# Altium PCB PCB1.PcbDoc
Units mil, origin at the board's own origin, x right, y up, seen from the top; angles counter-clockwise.
Board outline 4770 x 3855 mil, 2 copper layers (Top Layer, Bottom Layer); 31 components, 13 nets, 67 pads, 0 vias.
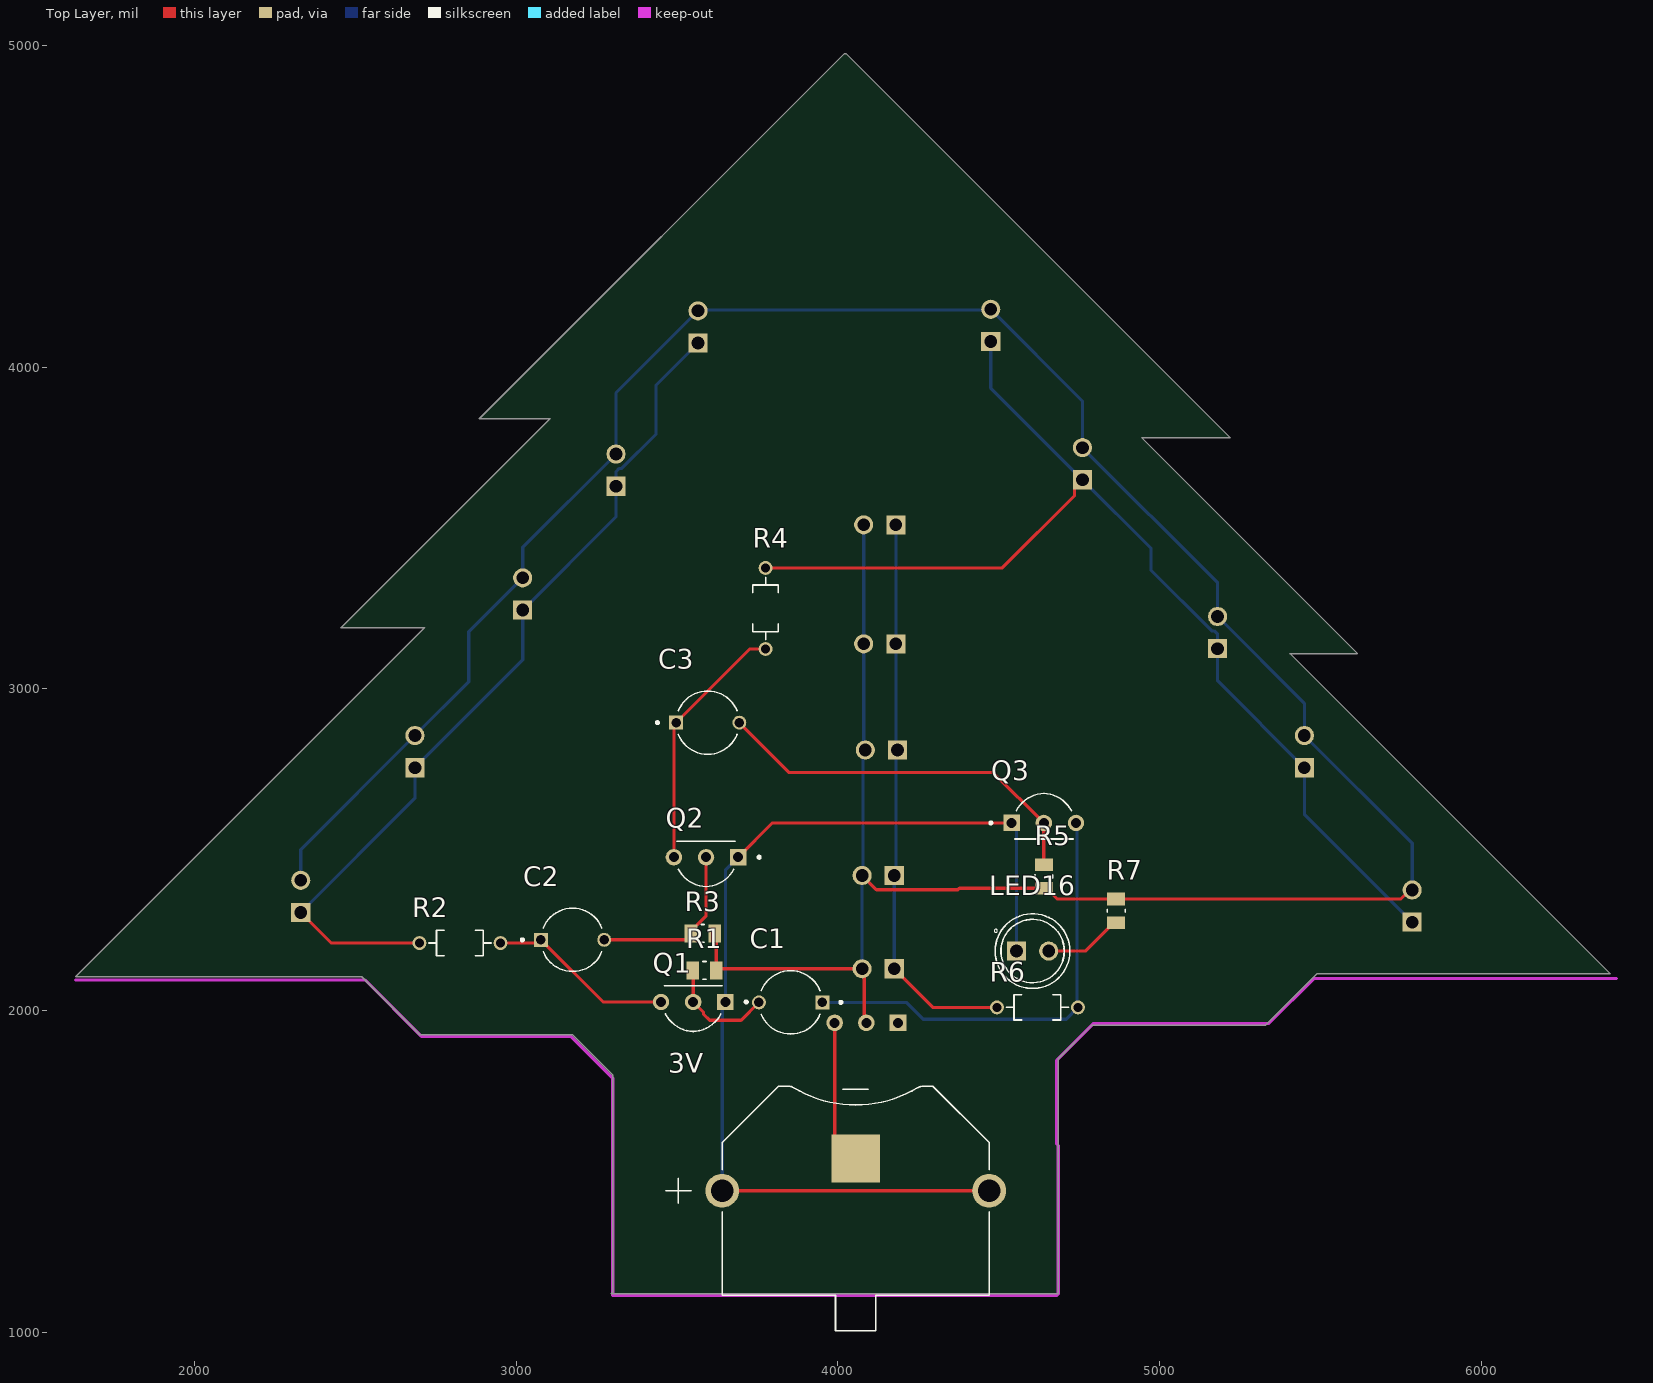
[diagram p0: Top Layer view]
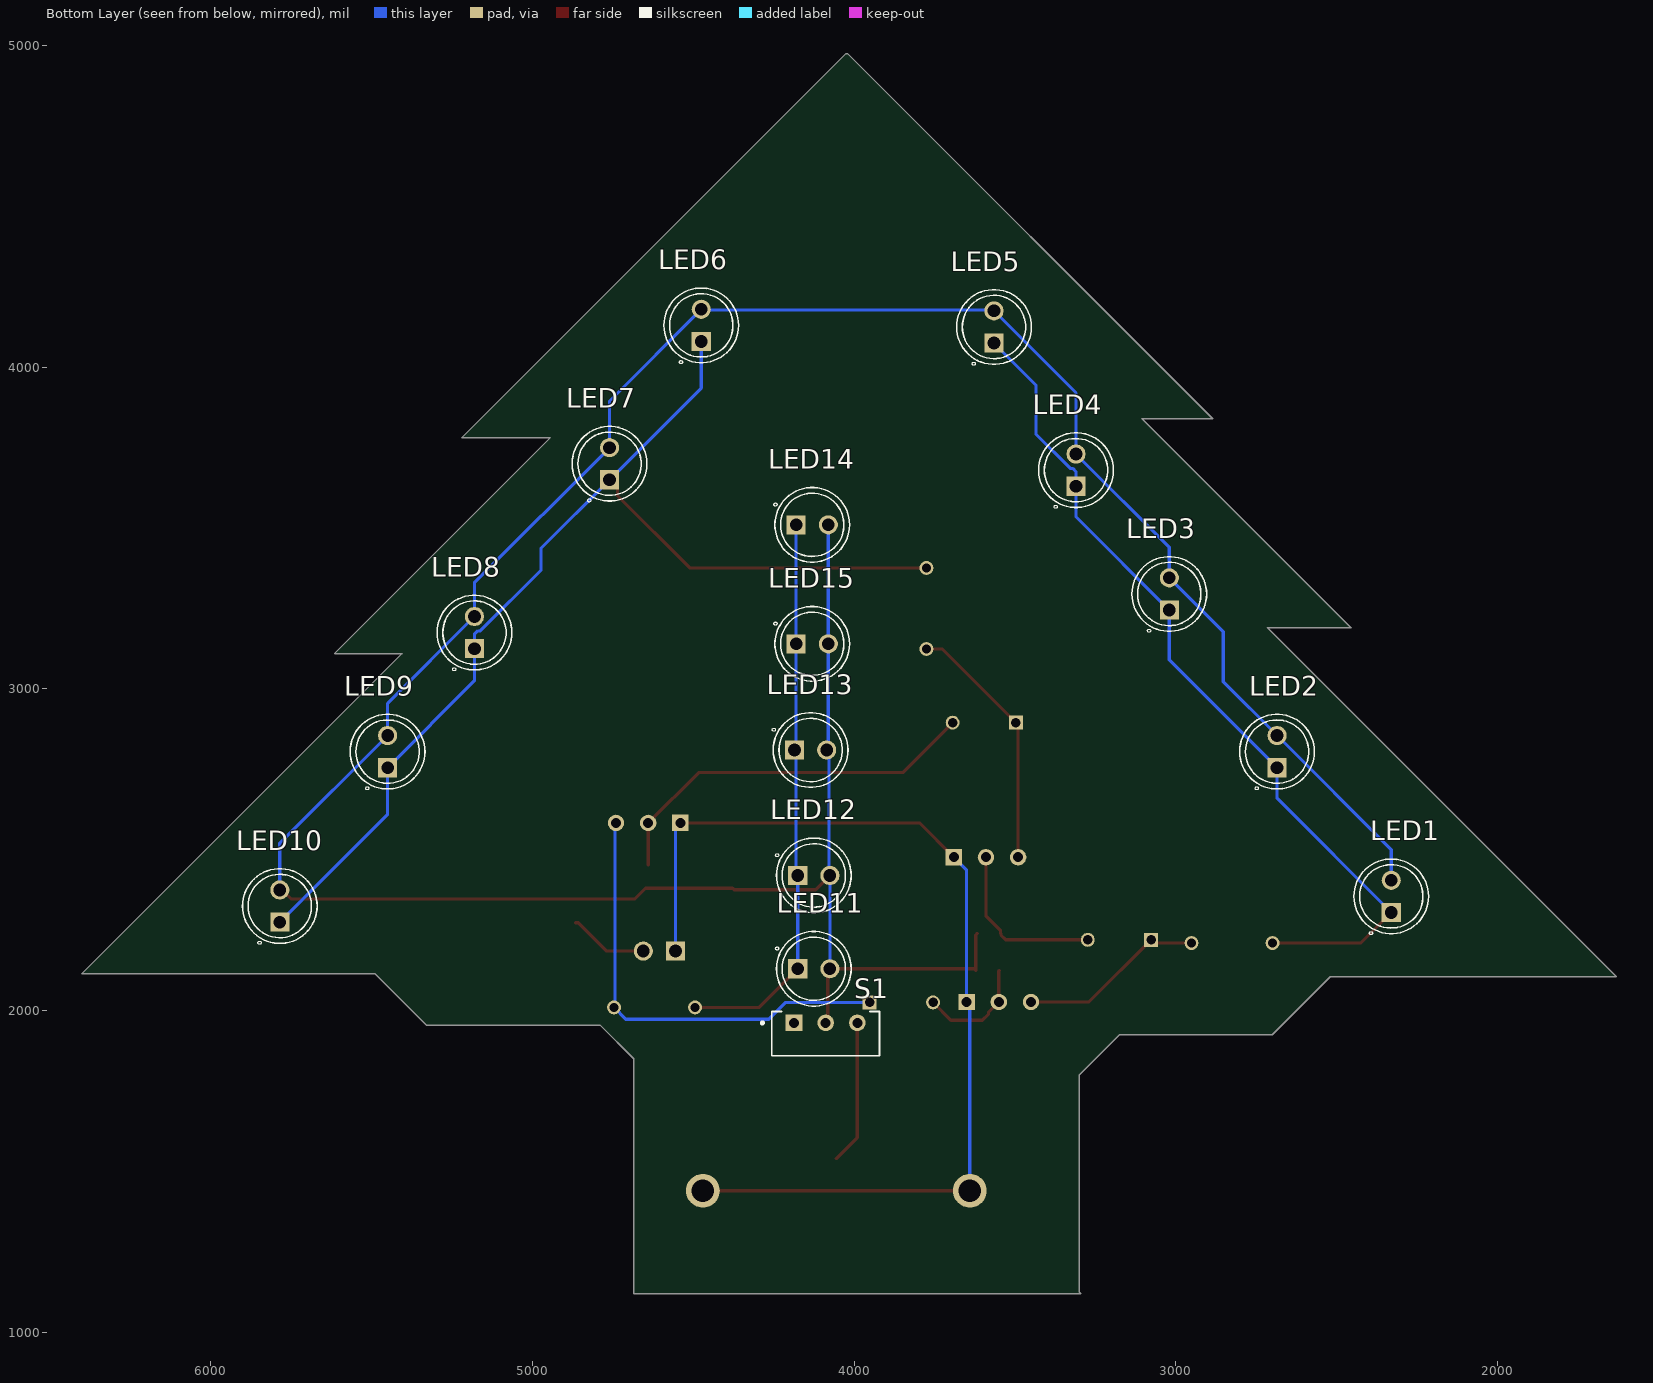
[diagram p1: Bottom Layer view, seen from below]
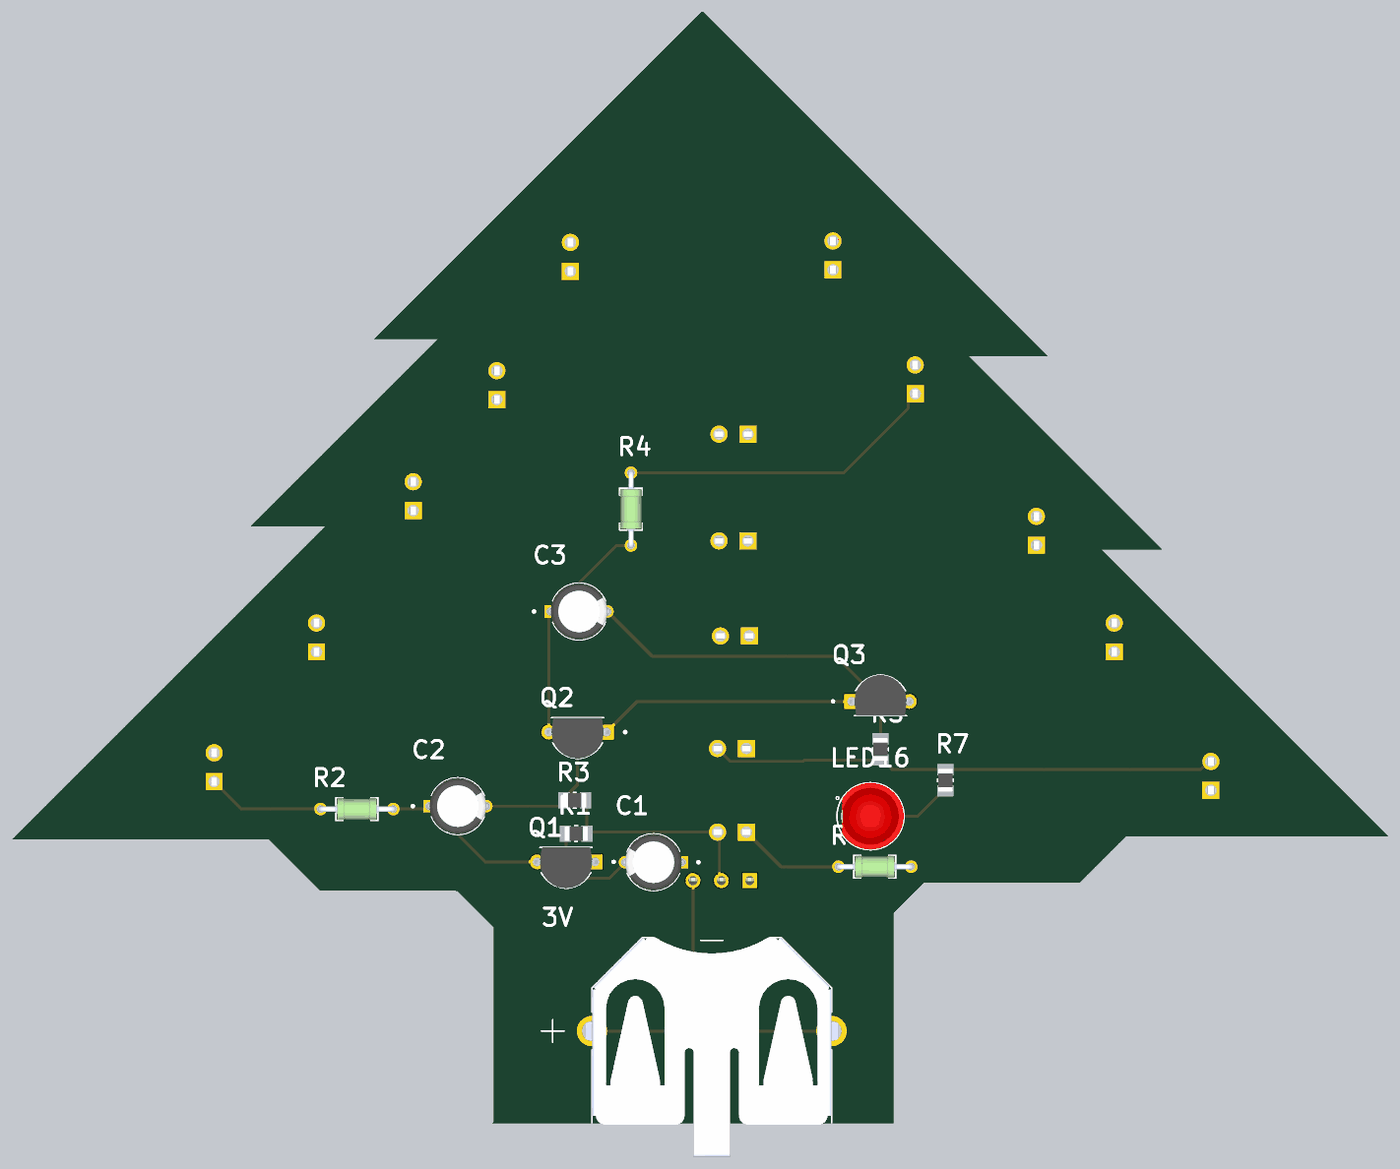
[diagram p2: 3D render of the assembled board from above, using the file's embedded part models]
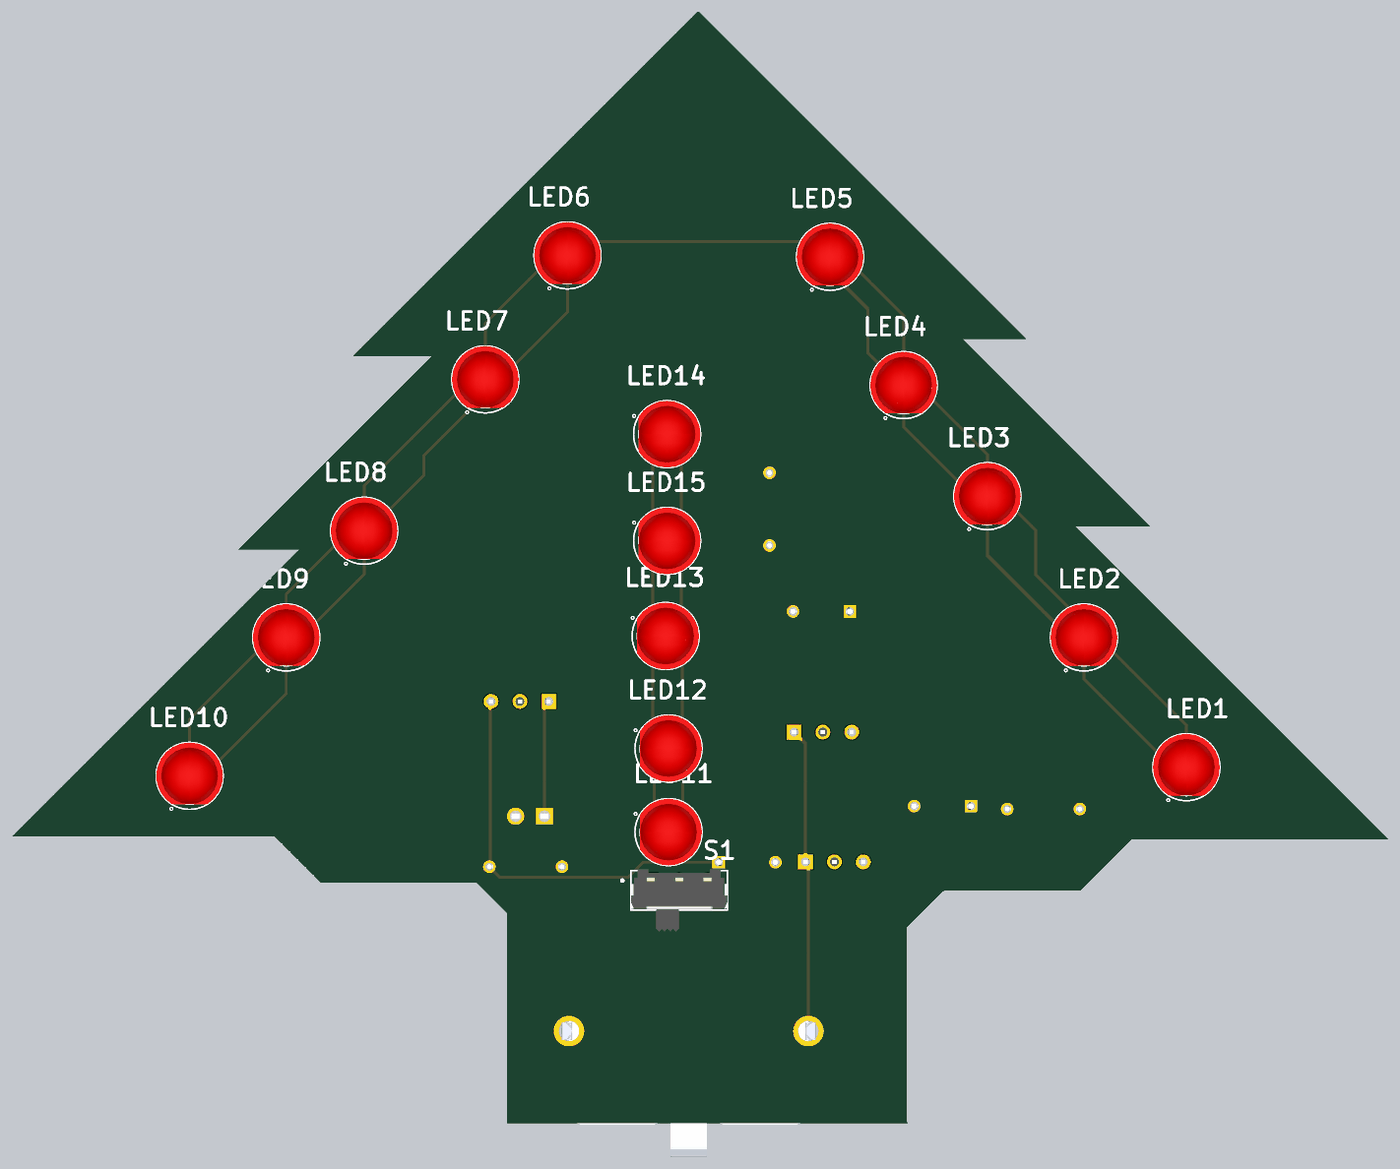
[diagram p3: 3D render of the assembled board from below, using the file's embedded part models]

## Layer stack, top to bottom
Top Solder: solder mask 0.4, Solder Resist, Dk 3.5
Top Layer: signal copper 1.4
Dielectric 1: dielectric 12.6, FR-4, Dk 4.8
Bottom Layer: signal copper 1.4
Bottom Solder: solder mask 0.4, Solder Resist, Dk 3.5

## Board outline
3175,1925 3300,1800 3300,1125 3295,1120 4685,1120 4685,1850 4790,1955 5330,1955 5490,2115 6400,2115 5405,3110 5615,3110 4945,3780 5220,3780 4025,4975 4020,4975 2885,3840 3105,3840 2455,3190 2715,3190 1630,2105 2520,2105 2700,1925

## Design rules (kind name [scope] priority, off if disabled: settings)
Clearance [All] p1: gap=10 ignorepadtopadclearanceinfootprint=FALSE
PolygonConnect [All] p1: connectstyle=Relief reliefconductorwidth=10 reliefentries=4 polygonreliefangle="90 Angle" airgapwidth=10
RoutingVias [All] p1: holewidth=28 width=50 viastyle="Through Hole" minholewidth=28 minwidth=50 maxholewidth=28 maxwidth=50
SolderMaskExpansion [All] p1: expansion=0 istentingtop=FALSE
Width [All] p1: maxlimit=10 minlimit=10 preferedwidth=10
30 further rules are at their usual default settings.

## Components (designator, comment, footprint, x,y, rotation, side; value= is the part's Value field where it differs from the comment)
3V "" BAT_BK-921 4055,1440 r0 top
C1 "" CAPPRD500W50D500H1100 3852.87,2025.51 r180 top
C2 "" CAPPRD500W50D500H1100 3175,2220 r0 top
C3 "" CAPPRD500W50D500H1100 3595,2895 r0 top
LED1 "" LED_WP7113ID 2330,2355 r90 bottom
LED2 "" LED_WP7113ID 2685,2805 r90 bottom
LED3 "" LED_WP7113ID 3020,3295 r90 bottom
LED4 "" LED_WP7113ID 3310,3680 r90 bottom
LED5 "" LED_WP7113ID 3565,4125 r90 bottom
LED6 "" LED_WP7113ID 4475,4130 r90 bottom
LED7 "" LED_WP7113ID 4760,3700 r90 bottom
LED8 "" LED_WP7113ID 5180,3175 r90 bottom
LED9 "" LED_WP7113ID 5450,2805 r90 bottom
LED10 "" LED_WP7113ID 5785,2325 r90 bottom
LED11 "" LED_WP7113ID 4125,2130 r180 bottom
LED12 "" LED_WP7113ID 4125,2420 r180 bottom
LED13 "" LED_WP7113ID 4135,2810 r180 bottom
LED14 "" LED_WP7113ID 4130,3510 r180 bottom
LED15 "" LED_WP7113ID 4130,3140 r180 bottom
LED16 "" LED_WP7113ID 4605,2185 r0 top
Q1 "" TO92254P470H750-3 3550,1935 r180 top
Q2 "" TO92254P470H750-3 3590,2385 r180 top
Q3 "" TO92254P470H750-3 4640,2675 r0 top
R1 "10k" RESC2012X65N 3585,2125 r0 top
R2 "2.2k" RESAD640W45L370D200 2825,2210 r180 top
R3 "10k" RESC2012X65N 3580,2240 r0 top
R4 "2.2k" RESAD640W45L370D200 3775,3250 r90 top
R5 "10k" RESC2012X65N 4640,2416.81 r270 top
R6 "2.2k" RESAD640W45L370D200 4620,2010 r180 top
R7 "10k" RESC2012X65N 4865,2310 r90 top
S1 "" SW_EG1270 4088.16,1961.83 r180 bottom

## Footprints (in the part's own frame and the unit in brackets; to place one, negate y for a bottom-side part, rotate by r counter-clockwise, add the part's x,y. Pads: shape width x height; smd on the part's side, far side on the other; paste and mask are expansions set on the pad)
BAT_BK-921 [mm]
  rect 3.81x3.81 smd: N(0,2.54)
  round 2.67 hole 1.78: P1(-10.54,0) P2(10.54,0)
  silkscreen extent -15,-11.06 10.54,8.25, body extent -11.17,-11.06 11.17,8.25, height 3.56
CAPPRD500W50D500H1100 [mm]
  round 1.1 hole 0.75: N(2.5,0)
  rect 1.1x1.1 / inner round 1.1 / far side rect 1.1x1.1 hole 0.75: P(-2.5,0)
  silkscreen extent -4.06,-2.5 2.32,2.5, body extent -2.75,-2.5 2.75,2.5, height 12.5
LED_WP7113ID [mm]
  round 1.508 hole 1: A(1.27,0)
  rect 1.508x1.508 / inner round 1.508 / far side rect 1.508x1.508 hole 1: C(-1.27,0)
  silkscreen extent -3.03,-2.95 2.95,2.95, body extent -2.5,-2.95 2.93,2.95, height 9.6
RESAD640W45L370D200 [mm]
  round 1.1 hole 0.7: 1(-3.2,0) 2(3.2,0)
  silkscreen extent -2.47,-1 2.47,1, body extent -3.42,-1 3.42,1, height 2
RESC2012X65N [mm]
  rect 1x1.42 smd: 1(-0.935,0) 2(0.935,0)
  silkscreen extent -0.12,-0.7 0.12,0.7, body extent -1,-0.63 1,0.63, height 0.65
SW_EG1270 [mm]
  rect 1.308x1.308 / inner round 1.308 / far side rect 1.308x1.308 hole 0.8 mask+0.102: 1(-2.5,0)
  round 1.308 hole 0.8 mask+0.102: 2(0,0) 3(2.5,0)
  silkscreen extent -5.1,-2.6 4.25,0.9, body extent -4.25,-4.5 4.25,1, height 6.06
TO92254P470H750-3 [mm]
  rect 1.298x1.298 / inner round 1.298 / far side rect 1.298x1.298 hole 0.79 mask+0.102: 1(-2.54,-2.33)
  round 1.298 hole 0.79 mask+0.102: 2(0,-2.33) 3(2.54,-2.33)
  silkscreen extent -4.29,-3.6 2.3,0, body extent -2.74,-3.6 2.74,0, height 8.09

## Part data
3V: library part BK-921, Package=None, Availability=Unavailable, MP=BK-921, Price=None
C1 C2 C3: library part ECA1JHG220B, "CAP ALUM 22UF 20% 63V RADIAL", Package="RADIAL-2 Panasonic", Check_prices=https://www.snapeda.com/parts/ECA-1JHG220B/Panasonic/view-part/?ref=eda, MF=Panasonic, MP=ECA-1JHG220B, SnapEDA_Link=https://www.snapeda.com/parts/ECA-1JHG220B/Panasonic/view-part/?ref=snap
LED1 LED2 LED3 LED4 LED5 LED6 LED7 LED8 LED9 LED10 LED11 LED12 LED13 LED14 LED15 LED16: library part WP7113ID, "Red 617nm LED Indication - Discrete 2V Radial", Package="Radial Kingbright", Availability="In Stock", Check_prices=https://www.snapeda.com/parts/WP7113ID/Kingbright/view-part/?ref=eda, MF=Kingbright, MP=WP7113ID, Price=None, Purchase-URL=https://pricing.snapeda.com/search/part/WP7113ID/?ref=eda, SnapEDA_Link=https://www.snapeda.com/parts/WP7113ID/Kingbright/view-part/?ref=snap
Q1 Q2 Q3: library part 2N2222A, "BJT, TO-92, 40V, 600mA, NPN, 0.625W, 150Â°C", Package="TO-92 Diotec", Check_prices=https://www.snapeda.com/parts/2N2222A/Diotec/view-part/?ref=eda, MF="Diotec Semiconductor", MP=2N2222A, SnapEDA_Link=https://www.snapeda.com/parts/2N2222A/Diotec/view-part/?ref=snap
R1 R3 R5 R7: library part CRGH0805J10K, "Resistor, Thick Film, Surface Mnt, 0805 10kOhm +/-5% 0.33W +/-200ppm/degC", Package=0805, Power_Rating=".33 W", Resistance=10K, Tolerance=5%, Voltage_Rating="150 V", Check_prices=https://www.snapeda.com/parts/CRGH0805J10K/TE+Connectivity+Passive+Product/view-part/?ref=eda, EU_RoHS_Compliance="Compliant with Exemptions", MF="TE Connectivity", MP=CRGH0805J10K, SnapEDA_Link=https://www.snapeda.com/parts/CRGH0805J10K/TE+Connectivity+Passive+Product/view-part/?ref=snap
R2 R4 R6: library part LR0204F2K2, "2.2 kOhms Â±1% 0.25W, 1/4W Through Hole Resistor Axial - Metal Film", Package="Axial TE Connectivity Passive Product", Check_prices=https://www.snapeda.com/parts/LR0204F2K2/TE/view-part/?ref=eda, MF="TE Connectivity Passive Product", MP=LR0204F2K2, SnapEDA_Link=https://www.snapeda.com/parts/LR0204F2K2/TE/view-part/?ref=snap
S1: library part EG1270, "Slide Switch, EG Series, SPDT, Non-Shorting, ON-ON, 300mA DC, 6VDC, R/A, PC", Package=None, Check_prices=https://www.snapeda.com/parts/EG1270/E-Switch/view-part/?ref=eda, MF=E-Switch, MP=EG1270, SnapEDA_Link=https://www.snapeda.com/parts/EG1270/E-Switch/view-part/?ref=snap

## Nets (pads, with @x,y where several pads share a name; then routed paths per layer and width w, separated by ;. In a path a pad name is that pad's centre, name@x,y a point inside that pad or via, vN(x,y) a via of type N, cw(c..) or ccw(c..) an arc to the next point about the centre after c; other vN are vias at no path point)
Net3V_N: 3V.N S1.3 | length 448.9
  Top Layer w10: S1.3 3989.73,1605.27 3V.N
Net3V_P1: 3V.P1 3V.P2 LED16.C Q1.1 Q2.1 Q3.1 | length 3186
  Top Layer w10: 3V.P1 3V.P2 ; Q2.1 3796.54,2583.27 Q3.1
  Bottom Layer w10: 3V.P1 3640.04,2016.77 Q1.1 3650,2436.73 Q2.1 ; Q3.1 4555,2568.27 LED16.C
NetC1_N: C1.N Q1.2 R1.1 | length 353.4
  Top Layer w10: R1.1 3550,2123.19 Q1.2 3582.14,1994.59 3582.14,1988.72 3600.86,1970 3698.94,1970 C1.N
NetC1_P: C1.P Q3.3 R6.1 | length 1407.2
  Bottom Layer w10: C1.P 4212.49,2025.51 4264.66,1973.35 4709.33,1973.35 R6.1 4742.99,2012.99 4742.99,2580.28 Q3.3
NetC2_N: C2.N Q2.2 R3.1 | length 538.3
  Top Layer w10: C2.N 3528.5,2220 3543.19,2234.69 R3.1 3545,2240 3545,2250.08 3590,2295.08 Q2.2
NetC2_P: C2.P Q1.3 R2.1 | length 583.2
  Top Layer w10: R2.1 3066.57,2210 C2.P 3269.84,2026.73 Q1.3
NetC3_N: C3.N Q3.2 R5.1 | length 1205.3
  Top Layer w10: C3.N 3848.55,2739.88 4483.39,2739.88 Q3.2 R5.1
NetC3_P: C3.P Q2.3 R4.1 | length 794.3
  Top Layer w10: Q2.3 3490,2888.43 C3.P 3725.59,3124.02 R4.1
NetLED1_A: LED1.A LED2.A LED3.A LED4.A LED5.A LED6.A LED7.A LED8.A LED9.A LED10.A LED11.A LED12.A LED13.A LED14.A LED15.A R1.2 R3.2 R5.2 R7.2 S1.2 | length 9446.4
  Top Layer w10: R3.2 3621.81,2235 R1.2 3626.81,2130 LED11.A 4081.58,2123.42 4081.58,1968.41 S1.2 ; LED12.A 4119.69,2375.31 4372.7,2375.31 4377.39,2380 R5.2 4648.27,2380 4681.46,2346.81 R7.2 5749.99,2346.81 5778.18,2375 LED10.A ; LED13.A@4075,2805 LED13.A@4085,2815 ; LED15.A@4075,3135 LED15.A
  Bottom Layer w10: LED1.A 2330,2500 LED2.A 2852.5,3022.5 2852.5,3177.5 LED3.A 3020,3440 LED4.A 3310,3920 LED5.A 3567.5,4177.5 4472.5,4177.5 LED6.A 4760,3895 LED7.A 5180,3330 LED8.A 5450,2955 LED9.A 5785,2520 LED10.A ; LED11.A LED12.A 4077.5,2422.5 4077.5,2807.5 4080,2810 LED15.A LED14.A
NetLED1_C: LED1.C LED2.C LED3.C LED4.C LED5.C R2.2 | length 2694.5
  Top Layer w10: LED1.C 2425,2210 R2.2
  Bottom Layer w10: LED1.C 2685,2660 LED2.C 3020,3090 LED3.C 3310,3535 LED4.C 3310,3674.69 3320.63,3685.31 3328.51,3685.31 3434.41,3791.22 3434.41,3944.41 LED5.C
NetLED6_C: LED6.C LED7.C LED8.C LED9.C LED10.C R4.2 | length 3465.4
  Top Layer w10: R4.2 4510.98,3375.98 4735.31,3600.31 4735.31,3625.31 LED7.C
  Bottom Layer w10: LED6.C 4475,3935 LED7.C 4973.09,3436.91 4973.09,3368.72 5161.49,3180.31 5169.37,3180.31 5180,3169.69 LED8.C 5180,3025 LED9.C 5450,2610 LED10.C
NetLED11_C: LED11.C LED12.C LED13.C LED14.C LED15.C R6.2 | length 1779.1
  Top Layer w10: LED15.C@4170,3130 LED15.C ; LED11.C 4295,2010 R6.2 ; LED14.C LED14.C@4190,3500
  Bottom Layer w10: LED11.C LED12.C 4180,2425 4180,2810 LED15.C LED14.C
NetLED16_A: LED16.A R7.1 | length 246.5
  Top Layer w10: LED16.A 4768.54,2185 4856.73,2273.19 R7.1
pads on no net: S1.1

## Keep-outs
Top Layer:
  lines w10: 1630,2095 2530,2095 2705,1920 3170,1920 3300,1790 3300,1115 4680,1115 4685,1120 4685,1580 ; 4680,1585 4680,1845 4795,1960 5340,1960 5480,2100 6420,2100

## Silkscreen, mask and mechanical layers (free items; w line width, h text height)
Mechanical 1:
  lines w10: 1630,2105 2715,3190 2455,3190 3105,3840 2885,3840 4020,4975 4025,4975 5220,3780 4945,3780 5615,3110 5405,3110 6400,2115 5490,2115 5330,1955 4800,1955 4790,1955 4685,1850 4685,1120 3295,1120 3300,1125 3300,1800 3175,1925 2700,1925 2520,2105 1630,2105